# Altium PCB PCB1.pcbdoc
Units mil, origin at the board's own origin, x right, y up, seen from the top; angles counter-clockwise.
Board outline 2481 x 1747.1 mil, 4 copper layers (Top Layer, Inner1, Inner2, Bottom Layer), stack 62.3 mil thick; 64 components, 59 nets, 226 pads, 93 vias.
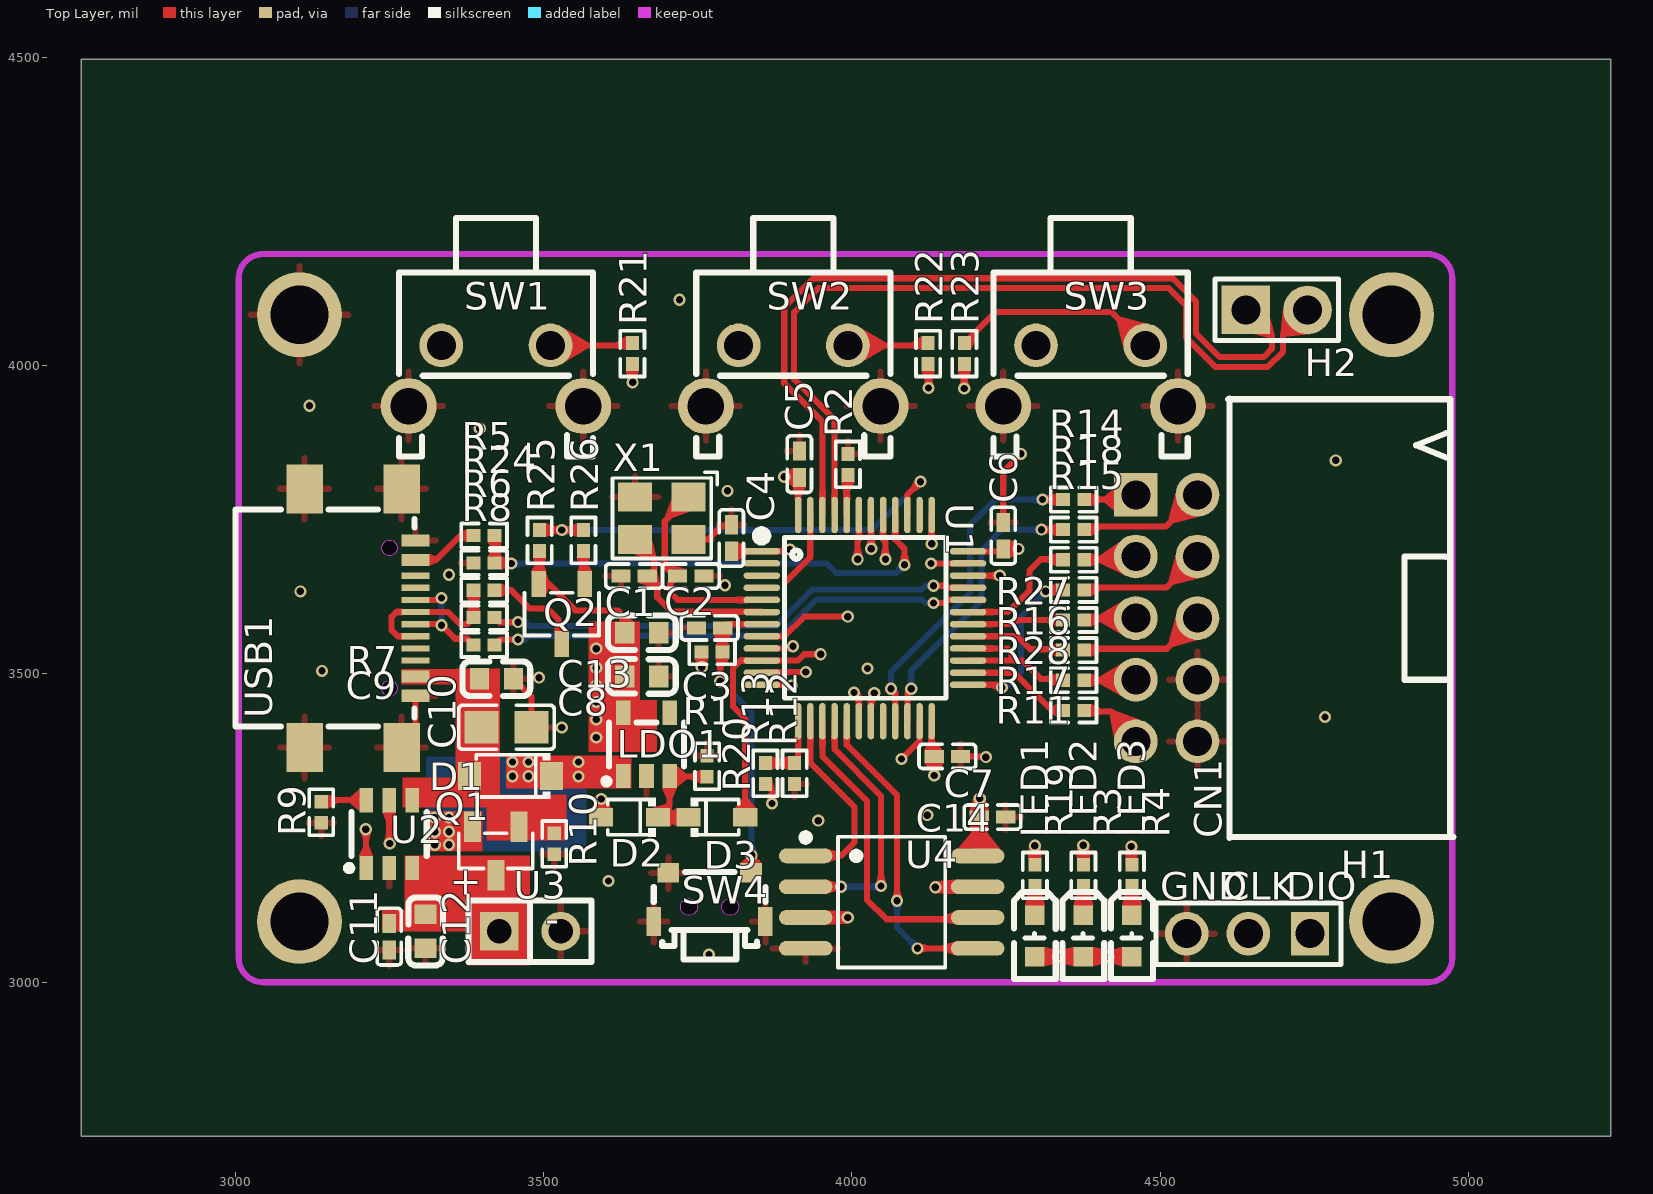
[diagram p0: Top Layer view]
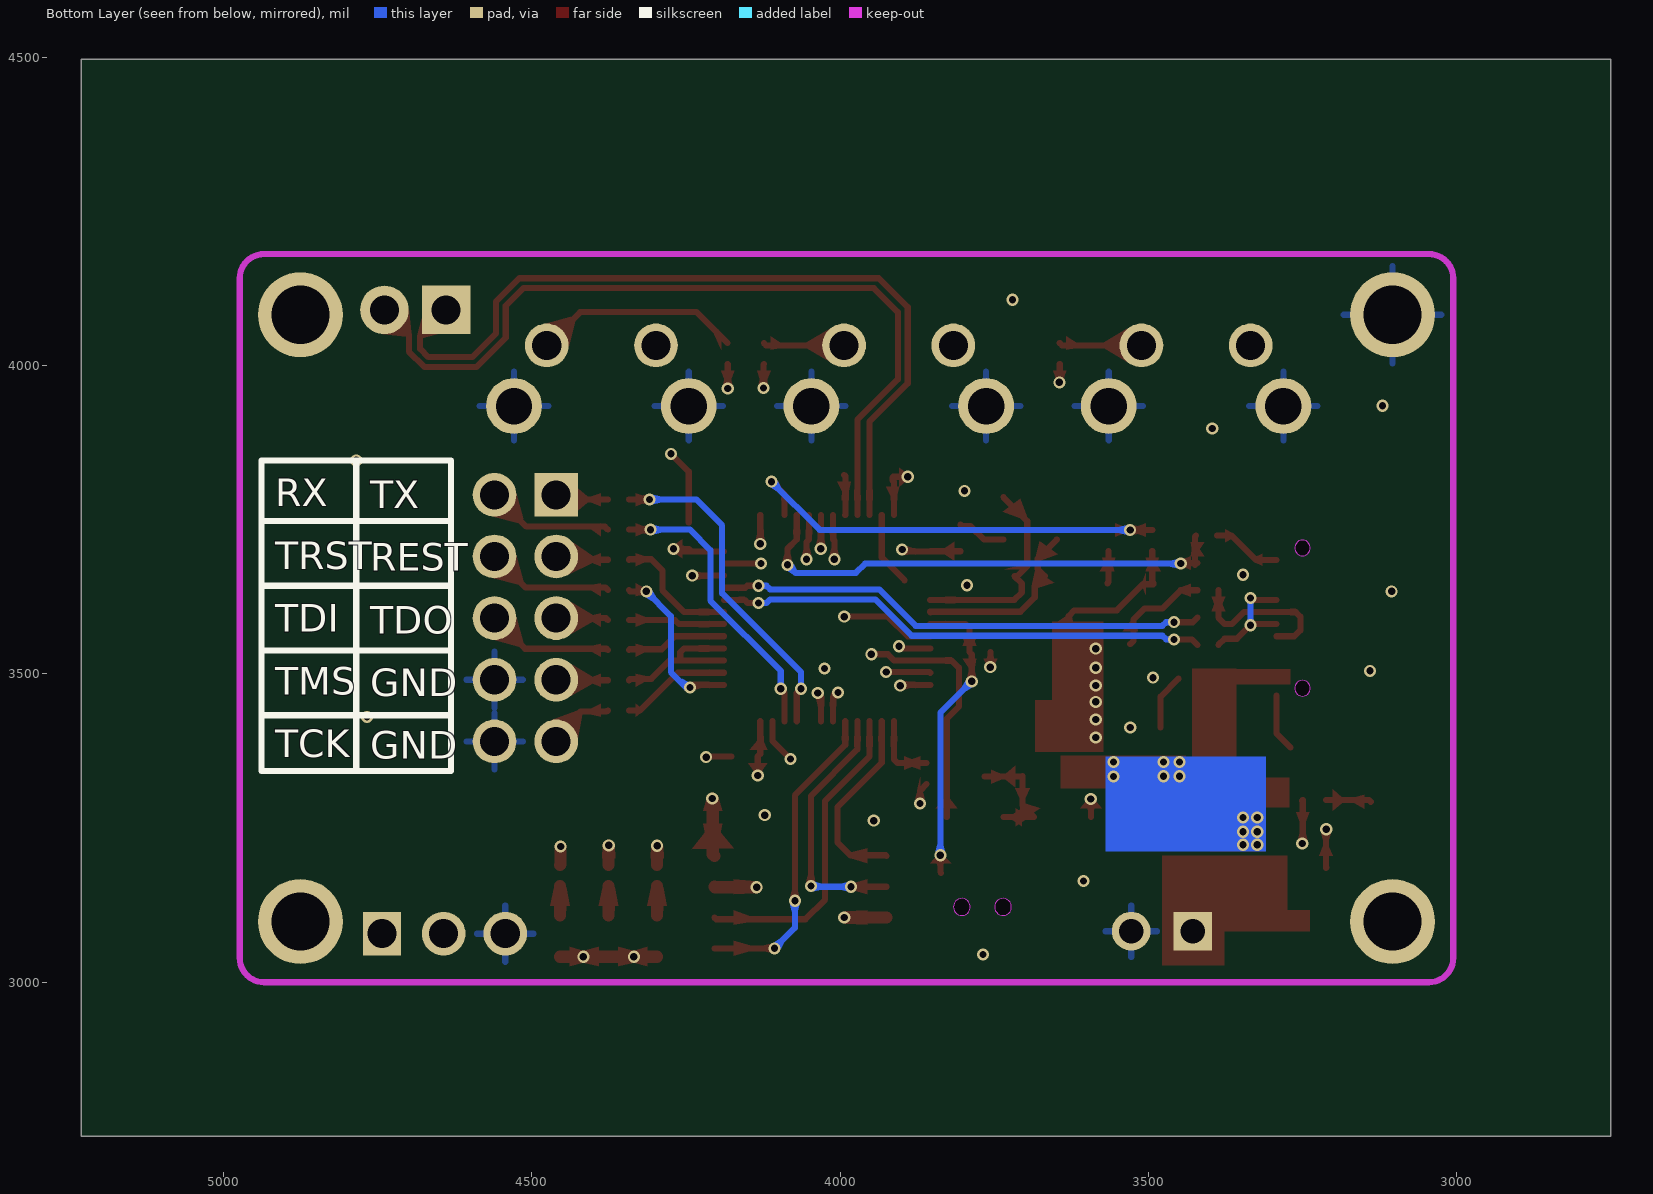
[diagram p1: Bottom Layer view, seen from below]
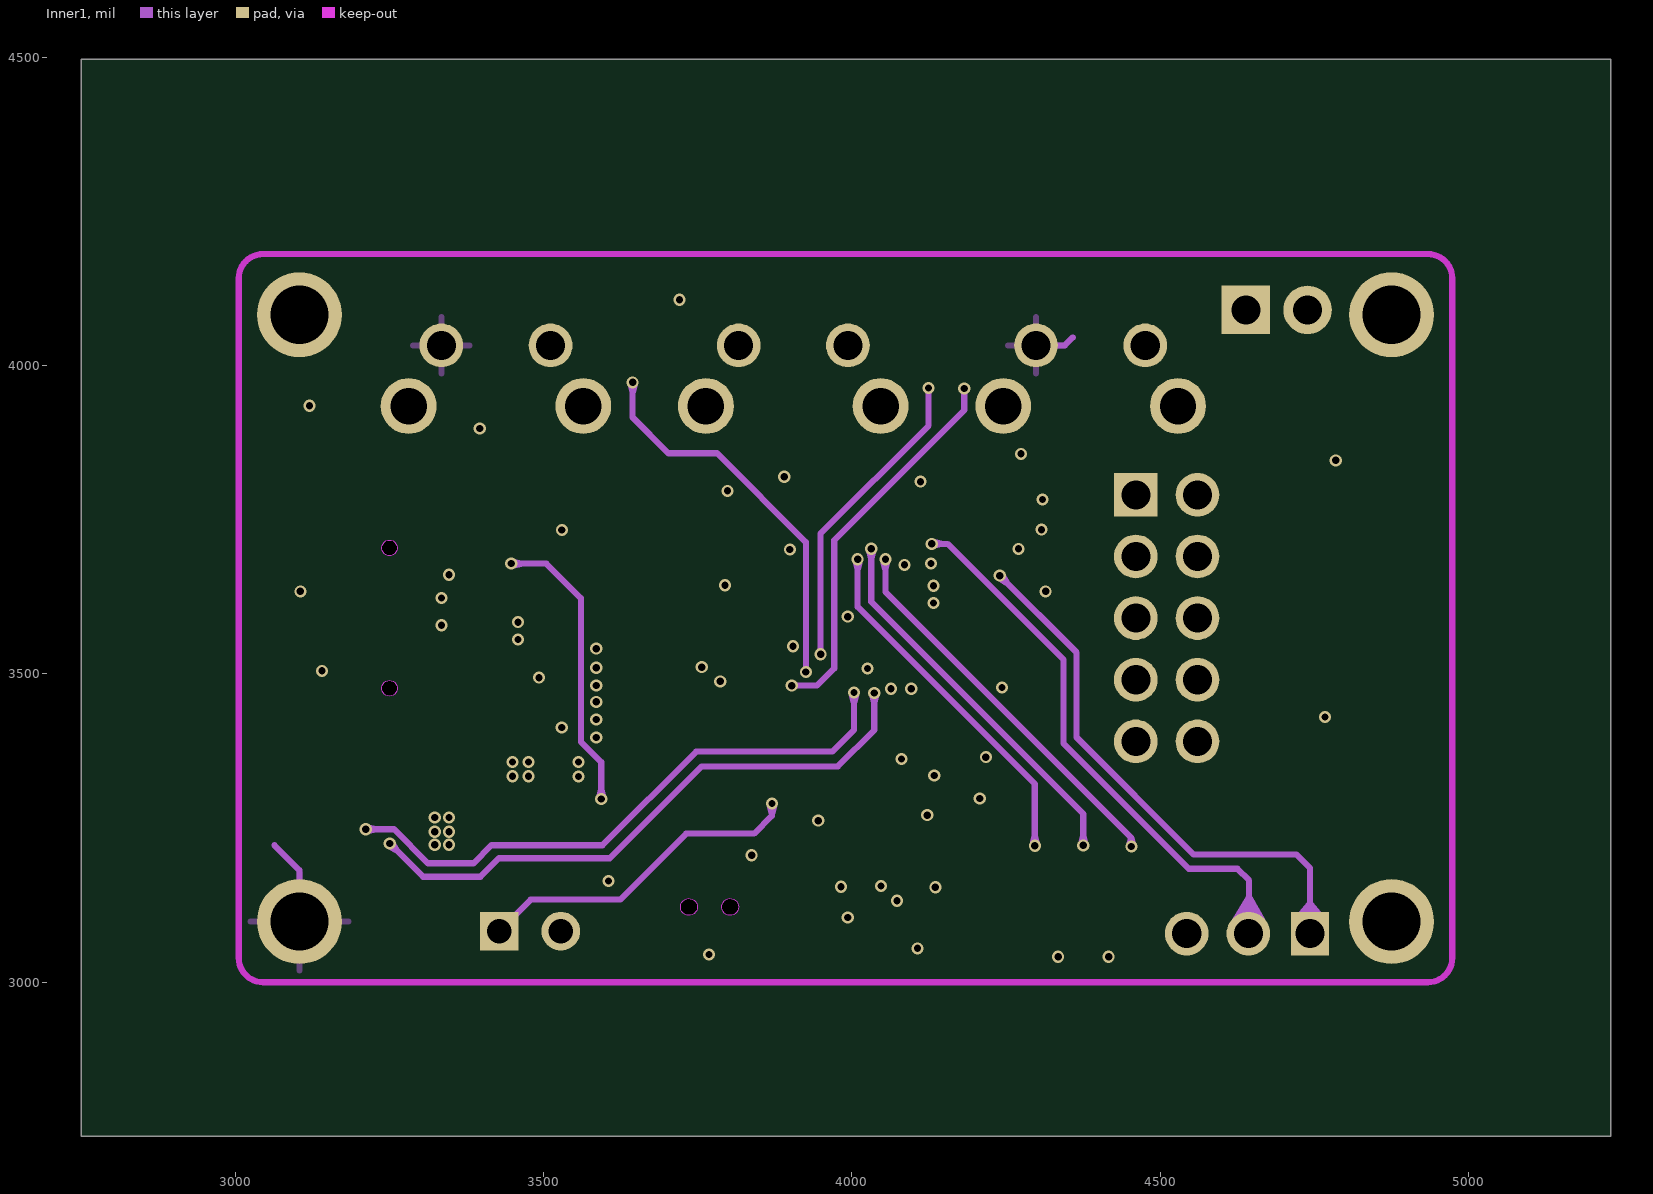
[diagram p2: Inner1]
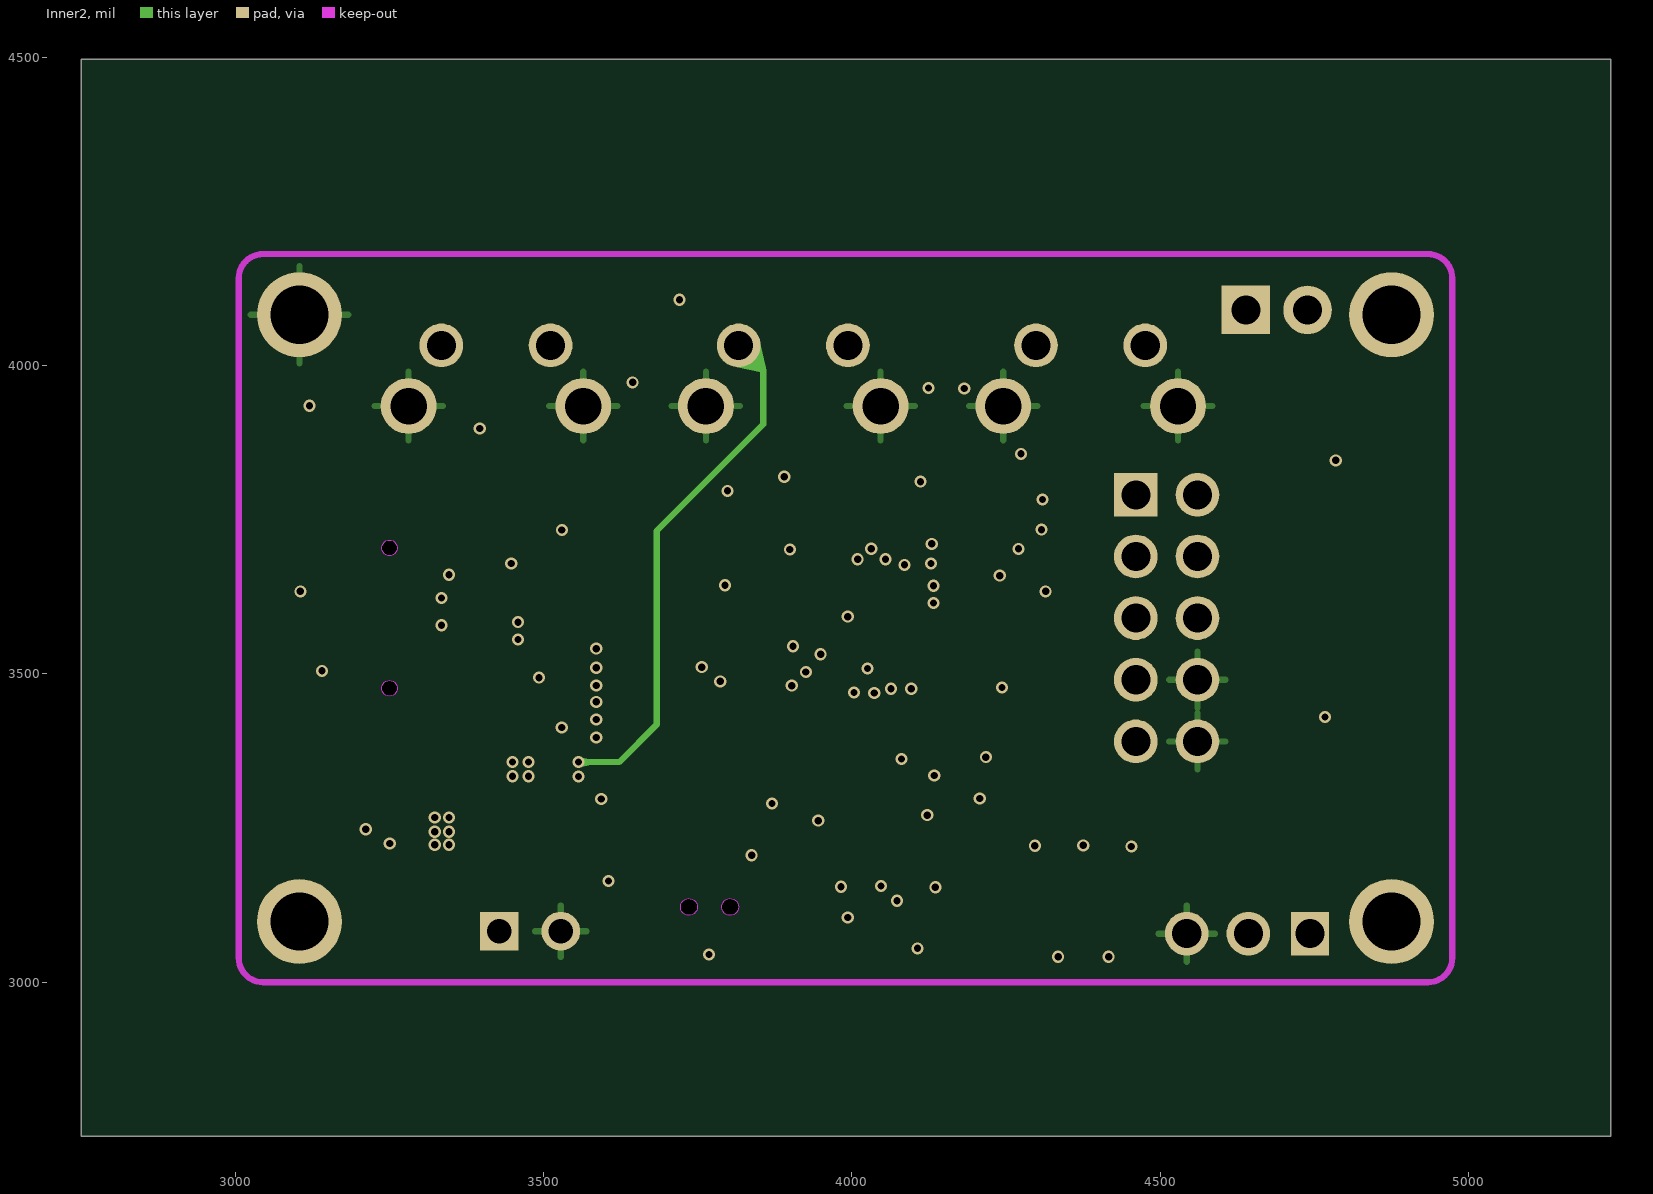
[diagram p3: Inner2]

## Layer stack, top to bottom
Top Solder Mask Layer: solder mask 0.4, Dk 3.3
Top Layer: signal copper 1.4
Dielectric1: surface 18.9, PP, Dk 4.5
Inner1: signal copper 1.4
Dielectric2: surface 18.9, FR4, Dk 4.5
Inner2: signal copper 1.4
Dielectric3: surface 18.9, PP, Dk 4.5
Bottom Layer: signal copper 1.4
Bottom Solder Mask Layer: solder mask 0.4, Dk 3.3

## Board outline
5231,2750 2750,2750 2750,4497.1 5231,4497.1

## Design rules (kind name [scope] priority, off if disabled: settings)
BoardOutlineClearance safeClearance [All] p0: genericclearance=10 ignorepadtopadclearanceinfootprint=FALSE except(0: Arc-SplitContinuation Track-SplitContinuation SMDPad-SplitContinuation THPad-SplitContinuation Via-SplitContinuation Fill-SplitContinuation Poly-SplitContinuation Region-SplitContinuation Text-SplitContinuation)
BoardOutlineClearance Plane_innerPlane [All] p0: genericclearance=10 ignorepadtopadclearanceinfootprint=FALSE except(0: Arc-SplitContinuation Track-SplitContinuation SMDPad-SplitContinuation THPad-SplitContinuation Via-SplitContinuation Fill-SplitContinuation Poly-SplitContinuation Region-SplitContinuation Text-SplitContinuation)
BoardOutlineClearance Copper_copperRegion [All] p0: genericclearance=10 ignorepadtopadclearanceinfootprint=FALSE except(0: Arc-SplitContinuation Track-SplitContinuation SMDPad-SplitContinuation THPad-SplitContinuation Via-SplitContinuation Fill-SplitContinuation Poly-SplitContinuation Region-SplitContinuation Text-SplitContinuation)
BoardOutlineClearance otherClearance [All] p0: genericclearance=10 ignorepadtopadclearanceinfootprint=FALSE except(0: Arc-SplitContinuation Track-SplitContinuation SMDPad-SplitContinuation THPad-SplitContinuation Via-SplitContinuation Fill-SplitContinuation Poly-SplitContinuation Region-SplitContinuation Text-SplitContinuation)
Clearance safeClearance [All] p1: gap=7 ignorepadtopadclearanceinfootprint=FALSE
Clearance Plane_innerPlane [All] p1: gap=7 ignorepadtopadclearanceinfootprint=FALSE
Clearance Copper_copperRegion [All] p1: gap=7 ignorepadtopadclearanceinfootprint=FALSE
Clearance otherClearance [All] p1: gap=7 ignorepadtopadclearanceinfootprint=FALSE
DiffPairsRouting differentialPair [All] p1: maxuncoupledlength=100 minlimit=6 maxlimit=Infinity mostfreqgap=6 toplayer_minwidth=6.4 toplayer_prefwidth=6.4 toplayer_maxwidth=10 bottomlayer_minwidth=6.4 bottomlayer_prefwidth=6.4 bottomlayer_maxwidth=10 midlayer1_minwidth=6.4 midlayer1_prefwidth=6.4 midlayer1_maxwidth=10 midlayer2_minwidth=6.4 midlayer2_prefwidth=6.4 midlayer2_maxwidth=10
PasteMaskExpansion pasteMaskExpansion [All] p1: expansion=0
PlaneConnect innerPlane [All] p1: planeconnectstyle=Relief reliefexpansion=20 reliefentries=4 reliefconductorwidth=10 reliefairgap=10
PolygonConnect copperRegion [All] p1: connectstyle=Relief reliefentries=4 reliefconductorwidth=10 polygonreliefangle="90 Angle" airgapwidth=10
RoutingVias viaSize [All] p1: viastyle="Through Hole" holewidth=11.811 minholewidth=11.811 maxholewidth=236.2204 width=11.811 minwidth=11.811 maxwidth=236.2204
SolderMaskExpansion solderMaskExpansion [IsVia] p1: useseparateexpansions=TRUE expansion=-1000 expansionbottom=-1000
SolderMaskExpansion solderMaskExpansion [All] p2: useseparateexpansions=TRUE expansion=4 expansionbottom=4
Width trackWidth [All] p1: maxlimit=100 minlimit=5 preferedwidth=10

## Components (designator, comment, footprint, x,y, rotation, side; value= is the part's Value field where it differs from the comment)
C1 "" C0402#1 3646.8,3658.8 r180 top
C2 "" C0402#2 3738.9,3658.8 r180 top
C3 "" C0402#1 3769.2,3574.8 r0 top
C4 "" C0402#1 3804.7,3720.5 r270 top
C5 "" C0402#1 3914.9,3840.4 r270 top
C6 "" C0402#2 4245.6,3724.4 r270 top
C7 "" C0402#1 4155.1,3366.1 r180 top
C8 "" C0603#1 3659,3496.1 r180 top
C9 "" C0603#1 3423.6,3492.1 r0 top
C10 "" C0805 3439.7,3413.4 r0 top
C11 "" C0402#3 3249.5,3073.8 r90 top
C12 "" C0603#2 3308.6,3082.7 r90 top
C13 "" C0603#1 3659,3566.9 r180 top
C14 "" C0402#3 4228.1,3267.7 r0 top
CN1 "" IDC-TH_10P-P2.54_Z-231012010106 4510.6,3590.6 r90 top locked
D1 "" SOD-123_L2.8-W1.8-LS3.7-RD 3446.1,3334.6 r180 top
D2 "1N4007WS" SOD-323_L1.8-W1.3-LS2.5-RD#1 3639.3,3267.7 r180 top
D3 "1N4007WS" SOD-323_L1.8-W1.3-LS2.5-RD#2 3781,3267.7 r0 top
H1 "" HDR-TH_3P-P2.54-V-M-1 4643.2,3078.7 r180 top
H2 "PZ254V-11-02P" HDR-TH_2P-P2.54-V-M 4689.3,4090.6 r0 top
LDO1 "" SOT-23-5_L3.0-W1.7-P0.95-LS2.8-BR 3666.9,3385.8 r270 top
LED1 "" LED0603-R-RD 4296.8,3074.8 r270 top
LED2 "" LED0603-R-RD 4375.5,3074.8 r270 top
LED3 "" LED0603-R-RD 4454.3,3074.8 r270 top
Q1 "" SOT-23-3_L2.9-W1.3-P1.90-LS2.4-BR 3422.4,3213 r90 top
Q2 "S8550" SOT-23-3_L2.9-W1.6-P1.90-LS2.8-BR 3529.4,3597 r90 top
R1 "" R0402#1 3773.2,3535.4 r180 top
R2 "" R0402#1 3993.6,3839.9 r270 top
R3 "" R0402#2 4375.5,3173.2 r270 top
R4 "" R0402#2 4454.3,3173.2 r270 top
R5 "" R0402#2 3403.4,3724.4 r180 top
R6 "" R0402#1 3403.4,3635.7 r0 top
R7 "" R0402#1 3403.4,3547 r0 top
R8 "" R0402#2 3403.4,3591.4 r180 top
R9 "" R0402#3 3139.3,3275.6 r90 top
R10 "" R0402#3 3517.3,3224.4 r270 top
R11 "" R0402#1 4359.8,3440.9 r180 top
R12 "" R0402#2 3907,3338.6 r90 top
R13 "" R0402#1 3859.8,3338.6 r270 top
R14 "" R0402#1 4359.8,3782.9 r180 top
R15 "" R0402#1 4359.8,3685.2 r180 top
R16 "" R0402#1 4359.8,3587.5 r180 top
R17 "" R0402#1 4359.8,3489.8 r180 top
R18 "" R0402#2 4359.8,3734.1 r0 top
R19 "" R0402#2 4296.8,3173.2 r270 top
R20 "" R0402#3 3765.3,3350.4 r270 top
R21 "" R0402#2 3643.9,4019.7 r90 top
R22 "" R0402#2 4123.6,4019.7 r90 top
R23 "" R0402#2 4182.6,4019.7 r90 top
R24 "" R0402#1 3403.4,3680.1 r0 top
R25 "" R0402#1 3493.6,3716.5 r90 top
R26 "" R0402#2 3564.5,3716.5 r270 top
R27 "" R0402#2 4359.8,3636.3 r0 top
R28 "" R0402#2 4359.8,3538.6 r0 top
SW1 "" SW-TH_TS-1093C-A6B3-D1 3422.7,3983.8 r180 top locked
SW2 "" SW-TH_TS-1093C-A6B3-D1 3905,3983.8 r180 top locked
SW3 "" SW-TH_TS-1093C-A6B3-D1 4387.3,3983.8 r180 top locked
SW4 "1TS003B-1400-3500A-CT" KEY-SMD_1TS003B 3769.2,3137.8 r0 top locked
U1 "" LQFP-48_L7.0-W7.0-P0.50-LS9.0-BL 4021.2,3590.6 r270 top locked
U2 "" SOT-23-6_L2.9-W1.6-P0.95-LS2.8-BR 3249.5,3240.2 r270 top
U3 "" CONN-TH_T2B-SQ-LF-SN 3477.9,3082.7 r0 top
U4 "" SOP-8_L5.3-W5.2-P1.27-LS7.9-BL 4064.5,3129.9 r270 top locked
USB1 "" USB-C-SMD_TYPE-C-16P-QTGM027 3202.3,3590.6 r270 top locked
X1 "" OSC-SMD_4P-L3.2-W2.5-BL 3691.8,3752.3 r180 top

## Footprints (in the part's own frame and the unit in brackets; to place one, negate y for a bottom-side part, rotate by r counter-clockwise, add the part's x,y. Pads: shape width x height; smd on the part's side, far side on the other; paste and mask are expansions set on the pad)
C0402#1 [mil]
  rect 31.1x21.3 smd paste-3937 mask+2: 1(-21.4,0) 2(21.5,0)
  silkscreen extent -46,-20 46,20
C0402#2 [mil]
  rect 31.1x21.3 smd paste-3937 mask+2: 1(-21.5,0) 2(21.5,0)
  silkscreen extent -46,-20 46,20
C0402#3 [mil]
  rect 31.1x21.3 smd paste-3937 mask+2: 1(-21.5,0) 2(21.4,0)
  silkscreen extent -46,-20 46,20
C0603#1 [mil]
  rect 31.5x35.4 smd paste+0 mask+2: 1(-27.6,0) 2(27.6,0)
  silkscreen extent -55,-28 55,28
C0603#2 [mil]
  rect 31.5x35.4 smd paste+0 mask+2: 1(-27.6,0) 2(27.5,0)
  silkscreen extent -55,-28 55,28
C0805 [mil]
  rect 55.5x53.1 smd paste-3937 mask+2: 1(-40.5,0) 2(40.6,0)
  silkscreen extent -77,-36 77,36
CONN-TH_T2B-SQ-LF-SN [mil]
  rect 63x63 hole 39.4 paste+0 mask+2: 1(-50,0)
  round 63 hole 39.4 paste+0 mask+2: 2(50,0)
  silkscreen extent -100,-50 100,50
HDR-TH_2P-P2.54-V-M [mil]
  rect 78.7x78.7 hole 47.2 paste+0 mask+2: 1(-50,0)
  round 78.7 hole 47.2 paste+0 mask+2: 2(50,0)
  silkscreen extent -100,-50 100,50
HDR-TH_3P-P2.54-V-M-1 [mil]
  rect 62x70.9 hole 47.2 paste+0 mask+2: 1(-100,0)
  round 70.9 hole 47.2 paste+0 mask+2: 2(0,0) 3(100,0)
  silkscreen extent -150,-50 150,50
IDC-TH_10P-P2.54_Z-231012010106 [mil]
  rect 70.9x70.9 hole 47.2 paste+0 mask+2: 1(200,50)
  round 70.9 hole 47.2 paste+0 mask+2: 2(200,-50) 3(100,50) 4(100,-50) 5(0,50) 6(0,-50) 7(-100,50) 8(-100,-50) 9(-200,50) 10(-200,-50)
  silkscreen extent -356,-465 356,-100
KEY-SMD_1TS003B [mil]
  rect 35.4x31.5 smd paste+0 mask+2: 1(67,39.4) 2(-66.9,39.4)
  rect 23.6x47.2 smd paste+0 mask+2: 3(-90.5,-39.4) 4(90.6,-39.4)
  Board Outline Layer lines w0.1: -47.1,-17.4 -46.4,-20.5 -44.9,-23.3 -42.9,-25.8 -40.3,-27.7 -37.4,-29 -34.2,-29.5 -31,-29.3 -28,-28.4 -25.2,-26.8 -22.9,-24.6 -21.1,-21.9 -20,-18.9 -19.7,-15.8 -20,-12.6 -21.1,-9.6 -22.9,-6.9 -25.2,-4.7 -28,-3.1 -31,-2.2 -34.2,-2 -37.4,-2.6 -40.3,-3.8 -42.9,-5.7 -44.9,-8.2 -46.4,-11.1 -47.1,-14.2 -47.1,-17.4 ; 19.8,-17.4 20.5,-20.5 22,-23.3 24,-25.8 26.6,-27.7 29.5,-29 32.7,-29.5 35.9,-29.3 39,-28.4 41.7,-26.8 44.1,-24.6 45.8,-21.9 46.9,-18.9 47.3,-15.8 46.9,-12.6 45.8,-9.6 44.1,-6.9 41.7,-4.7 39,-3.1 35.9,-2.2 32.7,-2 29.5,-2.6 26.6,-3.8 24,-5.7 22,-8.2 20.5,-11 19.8,-14.2 19.8,-17.4
  Board Outline Layer region: -19.7,-15.8 -20,-18.9 -21.1,-21.9 -22.9,-24.6 -25.2,-26.8 -28,-28.4 -31,-29.3 -34.2,-29.5 -37.4,-29 -40.3,-27.7 -42.9,-25.8 -44.9,-23.3 -46.4,-20.5 -47.1,-17.4 -47.1,-14.2 -46.4,-11.1 -44.9,-8.2 -42.9,-5.7 -40.3,-3.8 -37.4,-2.6 -34.2,-2 -31,-2.2 -28,-3.1 -25.2,-4.7 -22.9,-6.9 -21.1,-9.6 -20,-12.6
  Board Outline Layer region: -19.7,-15.8 -20,-18.9 -21.1,-21.9 -22.9,-24.6 -25.2,-26.8 -28,-28.4 -31,-29.3 -34.2,-29.5 -37.4,-29 -40.3,-27.7 -42.9,-25.8 -44.9,-23.3 -46.4,-20.5 -47.1,-17.4 -47.1,-14.2 -46.4,-11.1 -44.9,-8.2 -42.9,-5.7 -40.3,-3.8 -37.4,-2.6 -34.2,-2 -31,-2.2 -28,-3.1 -25.2,-4.7 -22.9,-6.9 -21.1,-9.6 -20,-12.6
  Board Outline Layer region: 47.3,-15.8 46.9,-18.9 45.8,-21.9 44.1,-24.6 41.7,-26.8 39,-28.4 35.9,-29.3 32.7,-29.5 29.5,-29 26.6,-27.7 24,-25.8 22,-23.3 20.5,-20.5 19.8,-17.4 19.8,-14.2 20.5,-11 22,-8.2 24,-5.7 26.6,-3.8 29.5,-2.6 32.7,-2 35.9,-2.2 39,-3.1 41.7,-4.7 44.1,-6.9 45.8,-9.6 46.9,-12.6
  Board Outline Layer region: 47.3,-15.8 46.9,-18.9 45.8,-21.9 44.1,-24.6 41.7,-26.8 39,-28.4 35.9,-29.3 32.7,-29.5 29.5,-29 26.6,-27.7 24,-25.8 22,-23.3 20.5,-20.5 19.8,-17.4 19.8,-14.2 20.5,-11 22,-8.2 24,-5.7 26.6,-3.8 29.5,-2.6 32.7,-2 35.9,-2.2 39,-3.1 41.7,-4.7 44.1,-6.9 45.8,-9.6 46.9,-12.6
  Multi-Layer board cut-out: -19.7,-15.8 -20,-18.9 -21.1,-21.9 -22.9,-24.6 -25.2,-26.8 -28,-28.4 -31,-29.3 -34.2,-29.5 -37.4,-29 -40.3,-27.7 -42.9,-25.8 -44.9,-23.3 -46.4,-20.5 -47.1,-17.4 -47.1,-14.2 -46.4,-11.1 -44.9,-8.2 -42.9,-5.7 -40.3,-3.8 -37.4,-2.6 -34.2,-2 -31,-2.2 -28,-3.1 -25.2,-4.7 -22.9,-6.9 -21.1,-9.6 -20,-12.6
  Multi-Layer board cut-out: 47.3,-15.8 46.9,-18.9 45.8,-21.9 44.1,-24.6 41.7,-26.8 39,-28.4 35.9,-29.3 32.7,-29.5 29.5,-29 26.6,-27.7 24,-25.8 22,-23.3 20.5,-20.5 19.8,-17.4 19.8,-14.2 20.5,-11 22,-8.2 24,-5.7 26.6,-3.8 29.5,-2.6 32.7,-2 35.9,-2.2 39,-3.1 41.7,-4.7 44.1,-6.9 45.8,-9.6 46.9,-12.6
  silkscreen extent -91,-101 91,41
LED0603-R-RD [mil]
  rect 31.5x31.5 smd paste+0 mask+2: 1(33.5,0) 2(-33.5,0)
  silkscreen extent -72,-34 70,34
LQFP-48_L7.0-W7.0-P0.50-LS9.0-BL [mil]
  oval 10.6x59.1 smd paste+0 mask+2: 1(-108.3,-167.3) 2(-88.6,-167.3) 3(-68.9,-167.3) 4(-49.2,-167.3) 5(-29.5,-167.3) 6(-9.8,-167.3) 7(9.8,-167.3) 8(29.5,-167.3) 9(49.2,-167.3) 10(68.9,-167.3) 11(88.6,-167.3) 12(108.3,-167.3) 25(108.3,167.3) 26(88.6,167.3) 27(68.9,167.3) 28(49.2,167.3) 29(29.5,167.3) 30(9.8,167.3) 31(-9.8,167.3) 32(-29.5,167.3) 33(-49.2,167.3) 34(-68.9,167.3) 35(-88.6,167.3) 36(-108.3,167.3)
  oval 59.1x10.6 smd paste+0 mask+2: 13(167.3,-108.3) 14(167.3,-88.6) 15(167.3,-68.9) 16(167.3,-49.2) 17(167.3,-29.5) 18(167.3,-9.8) 19(167.3,9.8) 20(167.3,29.5) 21(167.3,49.2) 22(167.3,68.9) 23(167.3,88.6) 24(167.3,108.3) 37(-167.3,108.3) 38(-167.3,88.6) 39(-167.3,68.9) 40(-167.3,49.2) 41(-167.3,29.5) 42(-167.3,9.8) 43(-167.3,-9.8) 44(-167.3,-29.5) 45(-167.3,-49.2) 46(-167.3,-68.9) 47(-167.3,-88.6) 48(-167.3,-108.3)
  silkscreen extent -141,-176 130,132
OSC-SMD_4P-L3.2-W2.5-BL [mil]
  rect 55.1x47.2 smd paste+0 mask+2: 1(-43.4,-34.5) 2(43.3,-34.5) 3(43.3,34.4) 4(-43.4,34.4)
  silkscreen extent -90,-75 80,65
R0402#1 [mil]
  rect 22.3x21.3 smd paste-3937 mask+2: 1(-17,0) 2(17.1,0)
  silkscreen extent -37,-20 37,20
R0402#2 [mil]
  rect 22.3x21.3 smd paste-3937 mask+2: 1(-17.1,0) 2(17,0)
  silkscreen extent -37,-20 37,20
R0402#3 [mil]
  rect 22.3x21.3 smd paste-3937 mask+2: 1(-17,0) 2(17,0)
  silkscreen extent -37,-20 37,20
SOD-123_L2.8-W1.8-LS3.7-RD [mil]
  rect 37.4x45.3 smd paste+0 mask+2: 1(-66.6,0) 2(66.6,0)
  silkscreen extent -64,-37 55,37
SOD-323_L1.8-W1.3-LS2.5-RD#1 [mil]
  rect 39.4x29.5 smd paste+0 mask+2: 1(-46.2,0) 2(46.2,0)
  silkscreen extent -43,-32 36,32
SOD-323_L1.8-W1.3-LS2.5-RD#2 [mil]
  rect 39.4x29.5 smd paste+0 mask+2: 1(-46.1,0) 2(46.2,0)
  silkscreen extent -42,-32 36,32
SOP-8_L5.3-W5.2-P1.27-LS7.9-BL [mil]
  oval 24x86.8 smd paste+0 mask+2: 1(-75,-139.5) 2(-25,-139.5) 3(25,-139.5) 4(75,-139.5) 5(75,139.5) 6(25,139.5) 7(-25,139.5) 8(-75,139.5)
  silkscreen extent -111,-145 106,87
SOT-23-3_L2.9-W1.3-P1.90-LS2.4-BR [mil]
  rect 49.2x27.6 smd paste+0 mask+2: 1(39.4,-37.4) 2(39.4,37.4) 3(-39.4,0)
  silkscreen extent -29,-60 29,60
SOT-23-3_L2.9-W1.6-P1.90-LS2.8-BR [mil]
  rect 42.1x23.6 smd paste+0 mask+2: 1(48.6,-37.4) 2(48.6,37.4) 3(-48.6,0)
  silkscreen extent -35,-60 35,60
SOT-23-5_L3.0-W1.7-P0.95-LS2.8-BR [mil]
  rect 39.4x23.6 smd paste+0 mask+2: 1(51.2,-37.4) 2(51.2,0) 3(51.2,37.4) 4(-51.2,37.4) 5(-51.2,-37.4)
  silkscreen extent -35,-70 65,61
SOT-23-6_L2.9-W1.6-P0.95-LS2.8-BR [mil]
  rect 39.4x21.7 smd paste+0 mask+2: 1(55.1,-37.4) 2(55.1,0) 3(55.1,37.4) 4(-55.1,37.4) 5(-55.1,0) 6(-55.1,-37.4)
  silkscreen extent -35,-70 60,61
SW-TH_TS-1093C-A6B3-D1 [mil]
  round 70.9 hole 47.2 paste+0 mask+2: 1(-88.6,-49.2) 2(88.6,-49.2)
  round 90.6 hole 59.1 paste+0 mask+2: 3(-141.7,49.2) 4(141.7,49.2)
  silkscreen extent -158,-256 158,131
USB-C-SMD_TYPE-C-16P-QTGM027 [mil]
  rect 79.5x59.1 smd paste+0 mask+2: 17(209.8,67.4) 18(209.8,-90) 19(-209.8,-90) 20(-209.8,67.4)
  rect 19.7x45.3 smd paste+0 mask+2: A1(-126,90.1) A4(-94.5,90.1) A9(94.5,90.1) A12(126,90.1)
  rect 10.2x45.3 smd paste+0 mask+2: A5(-49.2,90.1) A6(-9.8,90.1) A7(9.8,90.1) A8(49.2,90.1) B5(68.9,90.1) B6(29.5,90.1) B7(-29.5,90.1) B8(-68.9,90.1)
  Board Outline Layer lines w0.1: 115.4,35 118.4,35.7 121.1,37.2 123.4,39.2 125.2,41.8 126.3,44.6 126.6,47.7 126.3,50.8 125.2,53.6 123.4,56.2 121.1,58.2 118.4,59.7 115.4,60.4 112.3,60.4 109.3,59.7 106.6,58.2 104.3,56.2 102.5,53.6 101.4,50.8 101,47.7 101.4,44.6 102.5,41.8 104.3,39.2 106.6,37.2 109.3,35.7 112.3,35 115.4,35 ; -112.2,35 -109.2,35.7 -106.5,37.2 -104.2,39.2 -102.4,41.8 -101.3,44.6 -101,47.7 -101.3,50.8 -102.4,53.6 -104.2,56.2 -106.5,58.2 -109.2,59.7 -112.2,60.4 -115.3,60.4 -118.3,59.7 -121,58.2 -123.3,56.2 -125.1,53.6 -126.2,50.8 -126.6,47.7 -126.2,44.6 -125.1,41.8 -123.3,39.2 -121,37.2 -118.3,35.7 -115.3,35 -112.2,35
  Board Outline Layer region: -101,47.7 -101.3,44.6 -102.4,41.8 -104.2,39.2 -106.5,37.2 -109.2,35.7 -112.2,35 -115.3,35 -118.3,35.7 -121,37.2 -123.3,39.2 -125.1,41.8 -126.2,44.6 -126.6,47.7 -126.2,50.8 -125.1,53.6 -123.3,56.2 -121,58.2 -118.3,59.7 -115.3,60.4 -112.2,60.4 -109.2,59.7 -106.5,58.2 -104.2,56.2 -102.4,53.6 -101.3,50.8
  Board Outline Layer region: -101,47.7 -101.3,44.6 -102.4,41.8 -104.2,39.2 -106.5,37.2 -109.2,35.7 -112.2,35 -115.3,35 -118.3,35.7 -121,37.2 -123.3,39.2 -125.1,41.8 -126.2,44.6 -126.6,47.7 -126.2,50.8 -125.1,53.6 -123.3,56.2 -121,58.2 -118.3,59.7 -115.3,60.4 -112.2,60.4 -109.2,59.7 -106.5,58.2 -104.2,56.2 -102.4,53.6 -101.3,50.8
  Board Outline Layer region: 126.6,47.7 126.3,44.6 125.2,41.8 123.4,39.2 121.1,37.2 118.4,35.7 115.4,35 112.3,35 109.3,35.7 106.6,37.2 104.3,39.2 102.5,41.8 101.4,44.6 101,47.7 101.4,50.8 102.5,53.6 104.3,56.2 106.6,58.2 109.3,59.7 112.3,60.4 115.4,60.4 118.4,59.7 121.1,58.2 123.4,56.2 125.2,53.6 126.3,50.8
  Board Outline Layer region: 126.6,47.7 126.3,44.6 125.2,41.8 123.4,39.2 121.1,37.2 118.4,35.7 115.4,35 112.3,35 109.3,35.7 106.6,37.2 104.3,39.2 102.5,41.8 101.4,44.6 101,47.7 101.4,50.8 102.5,53.6 104.3,56.2 106.6,58.2 109.3,59.7 112.3,60.4 115.4,60.4 118.4,59.7 121.1,58.2 123.4,56.2 125.2,53.6 126.3,50.8
  Multi-Layer board cut-out: -101,47.7 -101.3,44.6 -102.4,41.8 -104.2,39.2 -106.5,37.2 -109.2,35.7 -112.2,35 -115.3,35 -118.3,35.7 -121,37.2 -123.3,39.2 -125.1,41.8 -126.2,44.6 -126.6,47.7 -126.2,50.8 -125.1,53.6 -123.3,56.2 -121,58.2 -118.3,59.7 -115.3,60.4 -112.2,60.4 -109.2,59.7 -106.5,58.2 -104.2,56.2 -102.4,53.6 -101.3,50.8
  Multi-Layer board cut-out: 126.6,47.7 126.3,44.6 125.2,41.8 123.4,39.2 121.1,37.2 118.4,35.7 115.4,35 112.3,35 109.3,35.7 106.6,37.2 104.3,39.2 102.5,41.8 101.4,44.6 101,47.7 101.4,50.8 102.5,53.6 104.3,56.2 106.6,58.2 109.3,59.7 112.3,60.4 115.4,60.4 118.4,59.7 121.1,58.2 123.4,56.2 125.2,53.6 126.3,50.8
  silkscreen extent -176,-202 176,88

## Free pads (board coordinates)
  round 137.8 hole 94.5: 0(3103.9,3098.4) 0(3103.9,4082.7) 0(4875.5,3098.4) 0(4875.5,4082.7)

## Via types
v1: diameter 19.7, hole 11.8, Top Layer to Bottom Layer, 93 vias

## Nets (pads, with @x,y where several pads share a name; then routed paths per layer and width w, separated by ;. In a path a pad name is that pad's centre, name@x,y a point inside that pad or via, vN(x,y) a via of type N, cw(c..) or ccw(c..) an arc to the next point about the centre after c; other vN are vias at no path point)
3.3V: C4.2 C5.2 C6.2 C7.2 C8.2 C13.2 C14.1 LDO1.5 LED1.1 LED2.1 LED3.1 pad.0@3103.9,3098.4 Q2.2 R1.2 R25.1 SW1.2 SW3.2 U1.1 U1.9 U1.24 U1.36 U1.48 U4.3 U4.7 U4.8 | length 1430.4
  Top Layer w10: Q2.2@3491.7,3647.1 3493.6,3649 R25.1 ; Q2.2 3508.8,3645.6 3551.4,3603 3620.4,3603 3629.4,3594 3629.4,3498 C8.2 3631.4,3439 LDO1.5 ; R1.2 3756.1,3511.3 v1(3756.4,3511) ; C4.2 3853.7,3699 U1.1 3896.3,3698.9 v1(3899.4,3702) ; U1.9 3900.8,3541.4 v1(3904.4,3545) ; v1(3890.4,3820) 3913.8,3820 C5.2 3914.9,3813.9 3912.9,3811.9 U1.48 ; U1.24 4129.5,3370.2 C7.2 v1(4133.6,3335.1) v1@4132.4,3334 ; U1.36 C6.2@4241.5,3698.9 ; C6.2@4241.5,3698.9 C6.2 v1(4270.4,3702.9) 4266.3,3698.9 C6.2@4241.5,3698.9
  Top Layer w19.7: U4.3 3993.4,3104.9 v1(3993.4,3105) ; v1(4135.4,3154) 4203.1,3154 U4.7 ; U4.8 4206.6,3207.5 C14.1 4206.6,3297.2 v1(4207.4,3298) ; LED1.1 v1(4334.6,3041.3) LED2.1 v1(4416.5,3041.3) LED3.1
  Inner1 w10: 3063.4,3222 3103.9,3181.6 pad.0@3103.9,3098.4 ; SW3.2 4345.4,4033 4358.4,4046
  other v1: 3585.4,3396.9 3585.4,3426 3585.4,3454.7 3585.4,3481.4 3585.4,3510.1 3585.4,3541
5V: C9.1 C10.1 D1.2 Q1.1 R10.1 U2.4 USB1.A9
5V_S: R5.2 USB1.A4 | length 112.5
  Top Layer w10: USB1.A4 3325.5,3685.1 3364.9,3724.4 R5.2@3388.7,3724.4
$1N1115: C1.1 U1.6 X1.3 | length 298.9
  Top Layer w10: X1.3 3679.4,3687 3679.4,3670.1 C1.1 3684.4,3642.6 3684.4,3624.2 3707.6,3601 3854.5,3601 U1.6@3853.5,3600
$1N1116: C2.2 U1.5 X1.1 | length 340.8
  Top Layer w10: X1.1 3696.4,3748.1 3696.4,3675 3712.6,3658.8 C2.2 3705.4,3646.9 3705.4,3632 3717.4,3620 U1.5@3853.8,3620
$1N8401: R9.2 U2.6 | length 73.9
  Top Layer w10: R9.2 3141.9,3295.3 U2.6
$1N11995: D2.1 D3.1 LDO1.3 R20.2 | length 185.6
  Top Layer w10: D3.1 D2.1 3704.3,3286.5 LDO1.3 3705.5,3333.4 R20.2
$1N16874: CN1.1 R14.1 | length 87
  Top Layer w10: R14.1 4452.9,3782.9 CN1.1
$1N18455: CN1.3 R15.1 | length 86
  Top Layer w10: R15.1 4455.2,3685.2 CN1.3
$1N18483: CN1.5 R16.1 | length 85.1
  Top Layer w10: R16.1 4379.9,3590.6 CN1.5
$1N18511: CN1.7 R17.1 | length 84.1
  Top Layer w10: R17.1 4459.8,3489.8 CN1.7
$1N24488: LED1.2 R19.2 | length 47.9
  Top Layer w19.7: LED1.2 R19.2
$1N24516: LED2.2 R3.2 | length 47.9
  Top Layer w19.7: LED2.2 R3.2
$1N24544: LED3.2 R4.2 | length 47.9
  Top Layer w19.7: LED3.2 R4.2
$1N37909: R21.2 SW1.1 | length 134.1
  Top Layer w10: SW1.1 3640.1,4033 R21.2
$1N37992: R22.2 SW2.1 | length 131.5
  Top Layer w10: SW2.1 4119.8,4033 R22.2
$1N38075: R23.2 SW3.1 | length 336.5
  Top Layer w10: R23.2 4232.9,4087 4421.9,4087 SW3.1
$1N39164: Q2.3 R6.2 | length 165.3
  Top Layer w10: R6.2 3447.7,3635.7 3477.4,3606 3506.4,3606 3524.4,3588 3524.4,3553.4 Q2.3
$1N39413: Q2.1 R26.2 | length 53.3
  Top Layer w10: R26.2 3564.5,3649 Q2.1@3566.5,3647.1
$1N40670: CN1.9 R11.1 | length 110
  Top Layer w10: R11.1 4378.8,3439 4421.4,3439 4460.6,3399.9 CN1.9
$1N41019: CN1.2 R18.2 | length 207.2
  Top Layer w10: R18.2 4381.8,3739 4509,3739 CN1.2
$1N41105: CN1.4 R27.2 | length 206.3
  Top Layer w10: R27.2 4380.5,3640 4510,3640 CN1.4
$1N41192: CN1.6 R28.2 | length 205.3
  Top Layer w10: R28.2 4379.2,3541 4511,3541 CN1.6
BAT: C11.2 C12.2 Q1.3 R13.2 U2.3 U3.1 | length 576
  Top Layer w10: R13.2 3870.4,3310.9 v1(3870.4,3290)
  Inner1 w10: U3.1 3479.2,3134 3624.4,3134 3731.4,3241 3841.4,3241 3870.4,3270 v1(3870.4,3290)
BAT_ADC: R12.2 R13.1 U1.13 | length 117.3
  Top Layer w10: R13.1 R12.2 3912.9,3361.5 U1.13
BOOT: R2.2 U1.44 | length 66
  Top Layer w10: U1.44 3991.4,3758.1 3991.4,3820.6 R2.2
CHRG: U1.18 U2.1 | length 1079.5
  Top Layer w10: U2.1@3211.4,3185.8 U2.1 3212.1,3247.3 v1(3211.4,3248) ; v1(4003.4,3470) 4011.4,3462.1 U1.18
  Inner1 w10: v1(3211.4,3248) 3257.4,3248 3312.4,3193 3386.4,3193 3415.4,3222 3595.4,3222 3747.4,3374 3968.4,3374 4003.4,3409 v1(4003.4,3470)
D+: R6.1 R8.2 USB1.A6 USB1.B6 | length 257.8
  Top Layer w10: USB1.B6 3263.4,3561.1 3253.4,3571 3253.4,3593 3260.8,3600.4 USB1.A6 3345.1,3600.4 3364.4,3581 3376,3581 R8.2 R6.1
D-: R7.1 USB1.A7 USB1.B7 | length 195.4
  Top Layer w10: USB1.A7 3292.6,3581 3332.4,3581 v1(3334.4,3579) 3356.4,3557 3376.4,3557 R7.1 ; USB1.B7@3292.5,3620 3331.3,3620 v1(3334.4,3623.1)
  Bottom Layer w10: v1(3334.4,3579) v1@3334.4,3623
GND: C1.2 C2.1 C3.1 C4.1 C5.1 C6.1 C7.1 C8.1 C9.2 C10.2 C11.1 C12.1 C13.1 C14.2 CN1.8 CN1.10 H1.3 LDO1.2 pad.0@3103.9,4082.7 R2.1 R9.1 R10.2 R12.1 R20.1 R24.1 SW1.3 SW1.4 SW2.3 SW2.4 SW3.3 SW3.4 SW4.2 SW4.3 SW4.4 U1.8 U1.23 U1.35 U1.47 U2.2 U3.2 U4.4 USB1.17 USB1.18 USB1.19 USB1.20 USB1.A1 USB1.A12 X1.2 X1.4 | length 835.5
  Top Layer w10: USB1.17 3292.4,3403.5 USB1.A12 ; C9.2 3480.3,3463 C10.2 ; X1.4 3766.5,3717.9 3788.6,3740 3802.7,3740 C4.1 ; U1.8 3890.4,3561.1 3922.4,3593 v1(3993.4,3593) ; 3895.4,3652 3932.6,3689.1 U1.47 ; v1(4080.4,3362) 4109.8,3391.3 U1.23 ; v1(4128.4,3679) 4188.3,3679 U1.35 ; C7.1 4216.3,3366.1 v1(4217.4,3365) ; C6.1 4245.6,3828.2 v1(4274.4,3857)
  other v1: 3768.3,3044.8 3605.4,3164 3945.4,3262 4122.4,3271 3529.4,3413 4767.4,3430 3492.4,3494 3140.4,3505 4025.4,3509 3105.4,3634 3794.4,3644 3346.4,3661 3798.4,3797 4785,3846.5 3396.4,3898 3120.4,3935 3720.4,4107
IIC_SCL: H2.2 U1.45 | length 1343.4
  Top Layer w10: U1.45 3972,3912.4 3906.4,3978 3906.4,4087 3945.4,4126 4513.8,4126 4542.4,4097.4 4542.4,4045.4 4589.8,3998 4674.4,3998 4699.4,4023 4699.4,4050.7 H2.2
IIC_SDA: H2.1 U1.46 | length 1342.8
  Top Layer w10: U1.46 3952.4,3758 3952.4,3909.4 3890.4,3971.4 3890.4,4095 3937.4,4142 4520.4,4142 4558.4,4104 4558.4,4052 4596.4,4014 4667.8,4014 4681.4,4027.6 4681.4,4048.4 H2.1
KEY_L: R21.1 U1.11 | length 734.5
  Top Layer w10: R21.1 3643.9,3973.6 v1(3644.4,3973) ; U1.11 3854.9,3503 v1(3925.4,3503)
  Inner1 w10: v1(3644.4,3973) 3644.4,3916 3702.4,3858 3781.4,3858 3925.6,3713.8 3925.6,3503.2 v1(3925.4,3503)
KEY_M: D3.2 R22.1 U1.10 | length 945
  Top Layer w10: D3.2 3827.2,3427.2 3807.4,3447 3807.4,3510 3819.1,3521.7 U1.10 3912.1,3521.7 3922.4,3532 v1(3949.4,3532) ; R22.1 4124.4,4001.8 v1(4124.4,3964)
  Inner1 w10: v1(3949.4,3532) 3949.4,3728 4124.4,3903 v1(4124.4,3964)
KEY_R: R23.1 U1.12 | length 710.8
  Top Layer w10: U1.12 3901.2,3482.3 v1(3902.4,3481) ; v1(4182.4,3963) 4182.4,4002.5 R23.1
  Inner1 w10: v1(3902.4,3481) 3943.4,3481 3971.4,3509 3971.4,3717 4182.4,3928 v1(4182.4,3963)
LED1: R19.1 U1.43 | length 687.5
  Top Layer w10: v1(4009.4,3686) 4009.4,3716.2 4011.4,3718.1 U1.43
  Top Layer w19.7: R19.1 v1(4296.8,3221.4)
  Inner1 w10: v1(4009.4,3686) 4009.4,3609 4296.8,3321.7 v1(4296.8,3221.4)
LED2: R3.1 U1.42 | length 710.3
  Top Layer w10: U1.42 4031,3703.5 v1(4031.4,3703)
  Top Layer w19.7: v1(4375.4,3222) 4375.5,3221.9 R3.1
  Inner1 w10: v1(4031.4,3703) 4031.4,3617 4375.4,3273 v1(4375.4,3222)
LED3: R4.1 U1.41 | length 734.8
  Top Layer w10: U1.41 4050.7,3717.9 4054.4,3714.1 v1(4054.4,3686)
  Top Layer w19.7: v1(4453.4,3220) 4453.4,3191.1 R4.1
  Inner1 w10: v1(4054.4,3686) 4054.4,3633.1 4453.4,3234.1 v1(4453.4,3220)
POWER_EN: D2.2 R5.1 R24.2 U1.40 | length 1317.1
  Top Layer w10: R24.2 R24.2@3424.1,3680.1 ; R5.1@3422.8,3724.4 3424.1,3723.1 R24.2@3424.1,3680.1 ; R24.2@3424.1,3677.2 R24.2@3424.1,3680.1 ; v1(3447.4,3679) 3446.4,3680.1 R24.2@3424.1,3680.1 ; D2.2 3593.1,3296.7 v1(3593.4,3297) ; U1.40 4070.4,3718.1 4085.4,3703 v1(4085.4,3677)
  Inner1 w10: v1(3447.4,3679) 3504.4,3679 3560.4,3623 3560.4,3390 3593.4,3357 v1(3593.4,3297)
  Bottom Layer w10: v1(3447.4,3679) 3959.4,3679 3974.4,3664 4072.4,3664 v1(4085.4,3677)
REST: C3.2 R1.1 SW4.1 U1.7 | length 486.7
  Top Layer w10: v1(3786.4,3488) 3786.4,3531.7 R1.1 3790.2,3574.3 C3.2 3796.6,3580.8 U1.7 ; SW4.1 3837.4,3178.5 v1(3837.4,3206)
  Bottom Layer w10: v1(3786.4,3488) 3837.4,3437 v1(3837.4,3206)
SPI_CS: U1.14 U4.1 | length 314.6
  Top Layer w10: U4.1 3926.1,3206 3983.4,3206 4004.4,3227 4004.4,3284 3932.6,3355.9 U1.14
SPI_MISO: U1.16 U4.2 | length 421.5
  Top Layer w10: U4.2 v1(3982.4,3154.9) v1@3982.4,3155 ; U1.16 3972,3377.5 4047.4,3302 v1(4047.4,3156)
  Bottom Layer w10: v1(3982.4,3154.9) 4046.4,3154.9 v1(4047.4,3156)
SPI_MOSI: U1.17 U4.5 | length 513.6
  Top Layer w10: U1.17 3991.7,3384.8 4073.4,3303 v1(4073.4,3132) ; v1@4106.4,3055 v1(4106.5,3054.9) U4.5
  Bottom Layer w10: v1(4073.4,3132) 4073.4,3088 v1(4106.5,3054.9)
SPI_SCK: U1.15 U4.6 | length 513.2
  Top Layer w10: U1.15 3952.3,3366.2 4024.4,3294 4024.4,3134 4056.4,3102 4201.1,3102 U4.6
STDBY: U1.19 U2.5 | length 1086.8
  Top Layer w10: v1(3250.4,3225) 3249.5,3225.9 U2.5 U2.5@3250.4,3294.4 ; U1.19 4031,3463.5 v1(4036.4,3469)
  Inner1 w10: v1(3250.4,3225) 3304.4,3171 3397.4,3171 3427.4,3201 3607.4,3201 3756.4,3350 3977.4,3350 4036.4,3409 v1(4036.4,3469)
SWCLK: H1.2 U1.37 | length 954.4
  Top Layer w10: v1(4129.5,3711) U1.37
  Inner1 w10: v1(4129.5,3711) 4155.4,3711 4343.4,3523 4343.4,3387 4546.4,3184 4625.4,3184 4644.4,3165 4644.4,3079.9 H1.2
SWDIO: H1.1 U1.34 | length 939.2
  Top Layer w10: U1.34 v1(4240,3659.5) v1@4240.4,3659
  Inner1 w10: v1(4240,3659.5) 4364.4,3535 4364.4,3397 4554.4,3207 4721.4,3207 4743.2,3185.2 H1.1
TGT_NTRST: R15.2 U1.31 | length 208.7
  Top Layer w10: U1.31 4252.8,3600.4 4288.4,3636 4288.4,3668 4306.4,3686 4341.9,3686 R15.2
TGT_RSET: R27.1 U1.25 | length 274.9
  Top Layer w10: U1.25 4239.2,3482.3 v1(4243.4,3478) ; v1(4314.4,3634) 4340.4,3634 R27.1
  Bottom Layer w10: v1(4243.4,3478) 4249.4,3478 4274.4,3503 4274.4,3594 v1(4314.4,3634)
TGT_SWCLK: R11.2 U1.26 | length 179.5
  Top Layer w10: U1.26 4263.4,3502 4324.5,3440.9 R11.2
TGT_SWDIO: R17.2 U1.27 U1.28 | length 254.5
  Top Layer w10: U1.27 U1.27@4188.8,3522 ; U1.27@4188.5,3522 U1.27@4188.8,3522 ; U1.28 4253.1,3541.4 4259.3,3535.1 4259.3,3522 ; R17.2 4340.5,3492 4306.4,3492 4276.4,3522 4259.3,3522 ; U1.27@4188.8,3522 4259.3,3522
TGT_TDI: R16.2 U1.30 | length 157
  Top Layer w10: U1.30 4261.2,3580.8 4267.9,3587.5 R16.2
TGT_TDO: R28.1 U1.29 | length 163.6
  Top Layer w10: U1.29 4268.4,3561.1 4289.4,3540 4341.4,3540 R28.1
UART_RX: R18.1 U1.22 | length 473.5
  Top Layer w10: U1.22 4090.1,3469.6 v1(4096.4,3476) ; v1(4307.5,3734.1) R18.1
  Bottom Layer w10: v1(4096.4,3476) 4096.4,3505 4210.4,3619 4210.4,3701 4243.5,3734.1 v1(4307.5,3734.1)
UART_TX: R14.2 U1.21 | length 542.4
  Top Layer w10: v1(4063.4,3476) 4070.4,3469 U1.21 ; v1(4309.4,3783) 4342.6,3783 R14.2
  Bottom Layer w10: v1(4063.4,3476) 4063.4,3503 4191.4,3631 4191.4,3741 4233.4,3783 v1(4309.4,3783)
USB_DM: R7.2 U1.32 | length 803.2
  Top Layer w10: R7.2 3429.5,3556 v1(3458.4,3556) ; v1(4132.4,3615) 4149.9,3615 4155,3620.1 U1.32
  Bottom Layer w10: v1(3458.4,3556) 3471.3,3556 3477.3,3562 3884.1,3562 3943.1,3621 4113.6,3621 4119.6,3615 v1(4132.4,3615)
USB_DP: R8.1 U1.33 | length 801.8
  Top Layer w10: R8.1 3427.9,3584 v1(3458.4,3584) ; v1(4132.4,3643) 4150.7,3643 4153.9,3639.8 U1.33
  Bottom Layer w10: v1(3458.4,3584) 3471.3,3584 3477.3,3578 3877.4,3578 3936.4,3637 4113.6,3637 4119.6,3643 v1(4132.4,3643)
USB_EN: R25.2 R26.1 U1.39 | length 748.1
  Top Layer w10: R25.2 v1(3529.6,3733.6) R26.1 ; U1.39 4090.1,3790.6 v1(4111.4,3812)
  Bottom Layer w10: v1(3529.6,3733.6) 4033,3733.6 v1(4111.4,3812)
VCC_BT: D1.1 LDO1.1 Q1.2 SW2.2 | length 855.5
  Inner2 w10: v1(3556.4,3357) 3622.4,3357 3683.4,3418 3683.4,3732 3856.4,3905 3856.4,3992.9 SW2.2
  other v1: 3323.4,3223 3346.4,3223 3323.4,3244 3346.4,3244 3323.4,3267 3346.4,3267 3449.4,3334 3475.5,3334 3556.4,3333.6 3449.4,3357 3475.5,3357
pads on no net: LDO1.4 U1.2 U1.3 U1.4 U1.20 U1.38 USB1.A5 USB1.A8 USB1.B5 USB1.B8

## Polygon pours and split planes (outlines as drawn)
3.3V on Inner1 (solid, remove dead copper): 3005.4,4181.1 3005.4,3000 4974,3000 4974,4181.1
GND on Inner2 (solid, remove dead copper): 3005.4,4181.1 3005.4,3000 4974,3000 4974,4181.1
GND on Bottom Layer (solid, remove dead copper, pour order 6): 3012.4,3001 4981,3001 4981,4182.1 3012.4,4182.1
GND on Top Layer (solid, remove dead copper, pour order 6): 3012.5,4182.1 3012.5,3001 4981,3001 4981,4182.1

## Keep-outs
Board Outline Layer:
  lines w10: 3005.4,3039.4 3005.4,4141.7 3005.8,4146.9 3006.8,4151.9 3008.4,4156.8 3010.7,4161.4 3013.6,4165.7 3017,4169.6 3020.9,4173 3025.1,4175.8 3029.8,4178.1 3034.6,4179.8 3039.7,4180.8 3044.8,4181.1 4934.6,4181.1 4939.7,4180.8 4944.8,4179.8 4949.6,4178.1 4954.3,4175.8 4958.6,4173 4962.4,4169.6 4965.8,4165.7 4968.7,4161.4 4971,4156.8 4972.6,4151.9 4973.6,4146.9 4974,4141.7 4974,3039.4 4973.6,3034.2 4972.6,3029.2 4971,3024.3 4968.7,3019.7 4965.8,3015.4 4962.4,3011.5 4958.6,3008.1 4954.3,3005.3 4949.6,3003 4944.8,3001.3 4939.7,3000.3 4934.6,3000 3044.8,3000 3039.7,3000.3 3034.6,3001.3 3029.8,3003 3025.1,3005.3 3020.9,3008.1 3017,3011.5 3013.6,3015.4 3010.7,3019.7 3008.4,3024.3 3006.8,3029.2 3005.8,3034.2 3005.4,3039.4

## Other copper
Top Layer:
  region net 5V: 3269.5,3508 3269.5,3483 3411.4,3483 3411.4,3508
  region net 5V: 3357.3,3508.1 3357.3,3293 3428.5,3293 3428.5,3508.1
  region net 5V: 3271.5,3332 3271.5,3284 3414.5,3284 3414.5,3332
  region net 5V: 3407.5,3304 3407.5,3230.1 3536.9,3230.1 3536.9,3304
  region net BAT: 3274.9,3204.8 3274.9,3082.7 3477.9,3082.7 3477.9,3204.8
  region net BAT: 3238.4,3117 3238.4,3083 3357.5,3083 3357.5,3117
  region net BAT: 3376.9,3098.3 3376.9,3027.7 3477.9,3027.7 3477.9,3098.3
  region net VCC_BT: 3310.5,3277.5 3310.5,3212.6 3400.1,3212.6 3400.1,3277.5
  region net VCC_BT: 3439.5,3367 3439.5,3314.3 3642.3,3314.3 3642.3,3367
  region net 3.3V: 3573.5,3457 3573.5,3374 3683.5,3374 3683.5,3457
  region net 3.3V: 3573.5,3584.7 3573.5,3415.5 3656.1,3415.5 3656.1,3584.7
  region net 3.3V: 3812.5,3694 3829.6,3693.6 3829.6,3704.2 3813.4,3704
  region net 3.3V: 3894.9,3703.9 3878.1,3704.2 3878.1,3693.6 3894.9,3693.9
  region net $1N1116: 3812.8,3625 3813,3615 3829.6,3614.8 3829.6,3625.4
  region net REST: 3812.9,3575.8 3829.6,3575.5 3829.6,3586.1 3812.9,3585.8
  region net KEY_M: 3819.1,3526.7 3819.1,3516.7 3829.6,3516.4 3829.6,3527
  region net KEY_R: 3894.9,3477.3 3894.9,3487.3 3878.1,3487.6 3878.1,3477
  region net BAT_ADC: 3917.9,3382.2 3918.2,3399 3907.6,3399 3907.9,3382.2
  region net SPI_CS: 3937.6,3382.2 3937.9,3399 3927.3,3399 3927.6,3382.2
  region net SPI_SCK: 3957.3,3382.2 3957.6,3399 3947,3399 3947.3,3382.2
  region net SPI_MISO: 3977,3382.2 3977.3,3399 3966.7,3399 3967,3382.2
  region net SPI_MOSI: 3996.7,3384.8 3997,3399 3986.4,3399 3986.7,3384.8
  region net CHRG: 4006.4,3462.1 4006.1,3447.5 4016.7,3447.5 4016.4,3462.1
  region net STDBY: 4026,3463.5 4025.7,3447.5 4036.3,3447.5 4036,3463.5
  region net 3.3V: 4134.5,3382.2 4134.8,3399 4124.2,3399 4124.5,3382.2
  region net TGT_RSET: 4229.5,3487.3 4212.7,3487.6 4212.7,3477 4229.5,3477.3
  region net TGT_SWCLK: 4229.6,3497 4229.4,3507 4212.7,3507.3 4212.7,3496.7
  region net TGT_SWDIO: 4229.5,3536.4 4229.5,3546.4 4212.7,3546.7 4212.7,3536.1
  region net TGT_TDO: 4229.5,3566.1 4212.7,3566.4 4212.7,3555.8 4229.5,3556.1
  region net TGT_TDI: 4229.5,3575.8 4229.5,3585.8 4212.7,3586.1 4212.7,3575.5
  region net TGT_NTRST: 4229.5,3605.4 4212.7,3605.7 4212.7,3595.1 4229.5,3595.4
  region net USB_DM: 4155,3615.1 4164.2,3614.8 4164.2,3625.4 4155,3625.1
  region net USB_DP: 4153.9,3634.8 4164.2,3634.5 4164.2,3645.1 4153.9,3644.8
  region net SWDIO: 4229.5,3664.5 4212.7,3664.8 4212.7,3654.2 4229.5,3654.5
  region net SWCLK: 4134.5,3716.8 4134.8,3733.6 4124.2,3733.6 4124.5,3716.8
  region net USB_EN: 4085.1,3790.6 4084.8,3782.1 4095.4,3782.1 4095.1,3790.6
  region net POWER_EN: 4075.4,3718.1 4075.7,3733.6 4065.1,3733.6 4065.4,3718.1
  region net LED3: 4055.7,3717.9 4056,3733.6 4045.4,3733.6 4045.7,3717.9
  region net LED2: 4036,3716.8 4036.3,3733.6 4025.7,3733.6 4026,3716.8
  region net LED1: 4016.4,3718.1 4016.7,3733.6 4006.1,3733.6 4006.4,3718.1
  region net BOOT: 3996.4,3799.4 3986.4,3797.8 3986.4,3782.1 3997,3782.1
  region net IIC_SCL: 3967,3798.9 3966.7,3782.1 3977.3,3782.1 3977,3798.8
  region net IIC_SDA: 3957.4,3798.3 3947.4,3799.2 3947,3782.1 3957.6,3782.1
  region net 3.3V: 3907.9,3798.9 3907.6,3782.1 3918.2,3782.1 3917.9,3798.9
  region net $1N1116: 3697,3755.7 3708,3752.6 3736.3,3763.2 3707.6,3784
  region net $1N1115: 3683,3690.5 3676.1,3715.1 3647.4,3694.3 3675.7,3683.7
  region net $1N1115: 3680.9,3639.1 3688,3646.1 3683.8,3668 3652.7,3648.2
  region net $1N1116: 3692.9,3671.5 3701.9,3669.5 3733,3669.5 3700,3678.5
  region net REST: 3785.2,3549.2 3795.2,3549.2 3806.2,3564.2 3775.1,3564.2
  region net 3.3V: 3761.1,3511.3 3767.3,3524.8 3745,3524.8 3751.1,3511.3
  region net REST: 3785.2,3561.1 3779.1,3546.1 3801.3,3546.1 3795.2,3561.1
  region net REST: 3791.4,3509.8 3801.3,3524.8 3779.1,3524.8 3781.4,3509.8
  region net 3.3V: 3830.3,3694 3830.3,3704 3815.3,3714.6 3815.3,3683.5
  region net 3.3V: 3907.9,3788.3 3917.9,3788.3 3925.5,3803.3 3904.3,3803.3
  region net 3.3V: 3890.4,3815 3904.3,3803.3 3904.3,3834.5 3890.4,3825
  region net 3.3V: 4270.4,3707.9 4256.2,3718.5 4256.2,3687.4 4270.4,3697.9
  region net 3.3V: 4138.6,3340.5 4149.1,3355.5 4118,3355.5 4128.6,3340.5
  region net 3.3V: 4134.5,3391.8 4124.5,3391.8 4118,3376.8 4147,3376.8
  region net 3.3V: 3634.4,3528.8 3624.4,3528.8 3615.7,3513.8 3646.9,3513.8
  region net 3.3V: 3636.4,3463.3 3647.2,3478.3 3615.7,3478.3 3626.4,3463.3
  region net BOOT: 3996.4,3796.7 4004.3,3811.7 3983,3811.7 3986.4,3796.7
  region net 3.3V: 3636.4,3471.7 3626.4,3471.7 3617.7,3456.7 3641.3,3456.7
  region net $1N11995: 3709.3,3299.9 3716.1,3314.9 3692.5,3314.9 3699.3,3299.9
  region net $1N11995: 3731.1,3328.4 3731.1,3338.4 3716.1,3350.9 3716.1,3315.9
  region net D+: 3260.8,3605.4 3260.8,3595.4 3269.8,3595.3 3269.8,3605.5
  region net D+: 3263.4,3556.1 3269.8,3556 3269.8,3566.2 3263.4,3566.1
  region net 5V_S: 3325.5,3690.1 3315,3694.9 3315,3675.2 3325.5,3680.1
  region net 3.3V: 4334.6,3051.1 4312.5,3057.1 4312.5,3025.6 4334.6,3031.5
  region net $1N24488: 4306.6,3153.6 4286.9,3153.6 4281,3124.1 4312.5,3124.1
  region net 3.3V: 4334.6,3051.1 4334.6,3031.5 4359.8,3025.6 4359.8,3057.1
  region net 3.3V: 4416.5,3051.1 4391.3,3057.1 4391.3,3025.6 4416.5,3031.5
  region net $1N24516: 4385.4,3153.6 4365.7,3153.6 4359.8,3124.1 4391.3,3124.1
  region net 3.3V: 4416.5,3051.1 4416.5,3031.5 4438.5,3025.6 4438.5,3057.1
  region net $1N24544: 4464.1,3153.6 4444.4,3153.6 4438.5,3124.1 4470,3124.1
  region net CHRG: 3217.1,3219.8 3207.1,3219.8 3201.3,3204.8 3223,3204.8
  region net $1N8401: 3186.3,3300.3 3186.3,3290.3 3201.3,3277.8 3201.3,3312.8
  region net STDBY: 3244.5,3260.6 3254.5,3260.6 3260.4,3275.6 3238.7,3275.6
  region net $1N37909: 3534.8,4006.4 3571.6,4028 3571.6,4038 3534.8,4059.6
  region net $1N37992: 4017.1,4006.4 4053.9,4028 4053.9,4038 4017.1,4059.6
  region net $1N38075: 4478.1,4068.3 4436.8,4079.1 4429.8,4072 4440.5,4030.7
  region net $1N24488: 4306.6,3115.5 4307.4,3145.1 4286.2,3145.1 4286.9,3115.5
  region net LED1: 4306.6,3221.4 4286.9,3221.4 4286.2,3201.4 4307.4,3201.4
  region net $1N24516: 4385.4,3115.5 4386.2,3145.1 4364.9,3145.1 4365.7,3115.5
  region net LED2: 4385.4,3221.9 4365.7,3221.9 4364.9,3201.4 4386.2,3201.4
  region net $1N24544: 4464.1,3115.5 4464.9,3145.1 4443.6,3145.1 4444.4,3115.5
  region net $1N39164: 3446.6,3640.7 3431.6,3646.3 3431.6,3625.1 3446.6,3630.7
  region net D+: 3391.4,3610.1 3397.5,3625.1 3375.3,3625.1 3381.4,3610.1
  region net D+: 3391.4,3617 3381.4,3617 3375.3,3602 3397.5,3602
  region net $1N8401: 3164.9,3300.3 3149.9,3303.8 3149.9,3281.5 3164.9,3290.3
  region net 3.3V: 3634.4,3594 3624.4,3594 3615.7,3549.2 3646.9,3584.6
  region net 3.3V: 3634.4,3534.2 3646.9,3549.2 3615.7,3549.2 3624.4,3534.2
  region net BAT_ADC: 3881.4,3360.6 3881.4,3350.6 3896.4,3344.5 3896.4,3366.8
  region net BAT: 3866.9,3307.3 3874,3314.4 3870.4,3332.7 3870.4,3310.4
  region net BAT_ADC: 3885.4,3360.6 3870.4,3366.8 3870.4,3344.5 3885.4,3350.6
  region net UART_TX: 4316.6,3778 4331.6,3772.3 4331.6,3793.5 4316.6,3788
  region net $1N16874: 4403,3777.9 4403,3787.9 4388,3793.5 4388,3772.3
  region net TGT_NTRST: 4316.6,3691 4316.6,3681 4331.6,3674.6 4331.6,3695.8
  region net $1N18455: 4403,3680.2 4403,3690.2 4388,3695.8 4388,3674.6
  region net TGT_TDI: 4316.6,3582.5 4331.6,3576.9 4331.6,3598.1 4316.6,3592.5
  region net $1N18483: 4403,3585.6 4403,3595.6 4388,3598.1 4388,3576.9
  region net TGT_SWDIO: 4316.6,3497 4316.6,3487 4331.6,3479.2 4331.6,3500.4
  region net $1N18511: 4403,3484.8 4403,3494.8 4388,3500.4 4388,3479.2
  region net SPI_MOSI: 4146.7,3049.9 4172.6,3042.9 4172.6,3066.9 4146.7,3059.9
  region net SPI_SCK: 4145.8,3107 4148.6,3097 4172.6,3092.9 4172.6,3116.9
  region net 3.3V: 4137.8,3144.2 4172.6,3142.9 4172.6,3166.9 4135.4,3163.8
  region net 3.3V: 4216.5,3246.4 4196.8,3246.4 4172.2,3216.9 4241.1,3215.5
  region net 3.3V: 3992.8,3114.8 3956.4,3116.9 3956.4,3092.9 3992.8,3095.1
  region net SPI_MISO: 3982.3,3159.9 3956.4,3166.9 3956.4,3142.9 3982.3,3149.9
  region net SPI_CS: 3982.7,3201 3981.8,3211 3956.4,3216.9 3956.4,3192.9
  region net 3.3V: 4216.5,3227.6 4222.2,3257.1 4191.1,3257.1 4196.8,3227.6
  region net 3.3V: 4196.8,3297.2 4191.1,3278.3 4222.2,3278.3 4216.5,3297.2
  region net $1N40670: 4469.3,3424.9 4427,3440.6 4418.5,3434.8 4425.4,3395
  region net $1N18511: 4436.6,3516.6 4400.2,3494.8 4400.4,3484.8 4437.7,3463.5
  region net $1N41192: 4525.2,3592.8 4514.4,3551.5 4521.5,3544.4 4562.8,3555.2
  region net $1N18483: 4437.1,3617.1 4400.3,3595.6 4400.3,3585.6 4437.1,3564
  region net $1N41105: 4525.2,3692.8 4514.4,3651.5 4521.5,3644.4 4562.8,3655.2
  region net $1N18455: 4433.4,3713.3 4399.7,3690.2 4401.2,3680.2 4441.4,3660.7
  region net $1N41019: 4525.2,3792.8 4514.4,3751.5 4521.5,3744.4 4562.8,3755.2
  region net $1N16874: 4410.1,3777.9 4425.1,3765.4 4425.1,3800.4 4410.1,3787.9
  region net IIC_SDA: 4685,4051.9 4678.7,4075.9 4653.9,4051.2 4677.9,4044.9
  region net IIC_SCL: 4700,4093 4695.9,4054.2 4703,4047.2 4741.8,4051.3
  region net $1N37909: 3618.2,4038 3618.2,4028 3633.2,4025.6 3633.2,4047.9
  region net KEY_L: 3638.9,3976.5 3648.9,3976.5 3654.5,3991.5 3633.2,3991.5
  region net $1N37992: 4097.9,4038 4097.9,4028 4112.9,4025.6 4112.9,4047.9
  region net KEY_M: 4119.4,3976.5 4129.4,3976.5 4134.2,3991.5 4112.9,3991.5
  region net $1N38075: 4197.3,4058.5 4193.2,4047.9 4193.2,4025.6 4203.9,4050.9
  region net KEY_R: 4177.4,3976.5 4187.4,3976.5 4193.2,3991.5 4172,3991.5
  region net 5V_S: 3364.9,3729.4 3364.9,3719.4 3375.3,3713.8 3375.3,3735
  region net POWER_EN: 3429.1,3698.8 3431.6,3713.8 3409.4,3713.8 3419.1,3698.8
  region net POWER_EN: 3429.1,3705.7 3419.1,3705.7 3409.4,3690.7 3431.6,3690.7
  region net POWER_EN: 3446.4,3685.1 3431.6,3690.7 3431.6,3669.4 3446.4,3675.1
  region net $1N39413: 3569.5,3681.7 3559.5,3681.7 3555,3666.7 3578.7,3666.7
  region net 3.3V: 3488.6,3681.7 3480.2,3666.7 3503.9,3666.7 3498.6,3681.7
  region net 3.3V: 3508.8,3650.6 3503.9,3663.1 3503.9,3628.1 3508.8,3640.6
  region net $1N39164: 3529.4,3584.4 3519.4,3584.4 3517.6,3569.4 3541.3,3569.4
  region net USB_EN: 3519.3,3738.6 3504.3,3744.7 3504.3,3722.4 3519.3,3728.6
  region net 3.3V: 3488.6,3673.4 3498.6,3673.4 3504.3,3688.4 3483,3688.4
  region net $1N39413: 3569.5,3673.4 3575.1,3688.4 3553.9,3688.4 3559.5,3673.4
  region net USB_EN: 3538.9,3738.6 3538.9,3728.6 3553.9,3722.4 3553.9,3744.7
  region net REST: 3832.4,3206 3819.9,3192.9 3853.9,3192.9 3842.4,3206
  region net TGT_SWCLK: 4324.5,3435.9 4331.6,3430.3 4331.6,3451.6 4324.5,3445.9
  region net $1N40670: 4403,3434 4403,3444 4388,3451.6 4388,3430.3
  region net $1N41019: 4403,3734 4403,3744 4388,3744.7 4388,3723.4
  region net UART_RX: 4316.6,3729.1 4331.6,3723.4 4331.6,3744.7 4316.6,3739.1
  region net $1N41105: 4403,3635 4403,3645 4388,3647 4388,3625.7
  region net TGT_RSET: 4316.6,3629 4331.6,3625.7 4331.6,3647 4316.6,3639
  region net $1N41192: 4403,3536 4403,3546 4388,3549.3 4388,3528
  region net TGT_TDO: 4316.6,3545 4316.6,3535 4331.6,3528 4331.6,3549.3
  region net POWER_EN: 3598.1,3296.7 3588.1,3296.7 3575.6,3282.5 3610.6,3282.5
  region net $1N11995: 3720.2,3272.7 3705.2,3282.5 3705.2,3253 3720.2,3262.7
  region net $1N11995: 3707.8,3283 3700.7,3290 3675.5,3282.5 3705.2,3262.7
  region net KEY_M: 3822.2,3297.5 3809.7,3282.5 3844.7,3282.5 3832.2,3297.5
  region net $1N11995: 3700.2,3272.7 3700.2,3262.7 3715.2,3253 3715.2,3282.5
  region net $1N11995: 3739.7,3328.4 3754.7,3322.2 3754.7,3344.5 3739.7,3338.4
  region net SPI_MISO: 4054.8,3162.5 4052.4,3172.7 4042.4,3172.7 4040.1,3162.5
  region net SPI_MOSI: 4080.8,3138.5 4078.4,3148.7 4068.4,3148.7 4066.1,3138.5
  region net SPI_MOSI: 4113,3047.5 4123.3,3049.9 4123.3,3059.9 4113,3062.3
  region net SPI_MISO: 3975.9,3162.3 3965.6,3159.9 3965.6,3149.9 3975.9,3147.5
  region net LED1: 4016.8,3692.5 4014.4,3702.7 4004.4,3702.7 4002.1,3692.5
  region net LED2: 4038.5,3709.8 4036,3720 4026,3719.5 4023.8,3709.2
  region net LED3: 4061.8,3692.5 4059.4,3702.7 4049.4,3702.7 4047.1,3692.5
  region net KEY_R: 3896.9,3489.1 3886.4,3487.3 3885.1,3477.3 3895.1,3474.5
  region net KEY_M: 4131.8,3970.5 4129.4,3980.7 4119.4,3980.7 4117.1,3970.5
  region net KEY_R: 4189.8,3969.5 4187.4,3979.7 4177.4,3979.7 4175.1,3969.5
  region net KEY_L: 3651.4,3979.9 3648.9,3990 3638.9,3989.4 3636.7,3979.1
  region net TGT_RSET: 4321,3626.6 4331.2,3629 4331.2,3639 4321,3641.4
  region net TGT_RSET: 4240.8,3487.5 4229.3,3487.3 4224.5,3477.3 4234.4,3474.2
  region net REST: 3793.8,3494.5 3791.4,3504.7 3781.4,3504.7 3779.1,3494.5
  region net REST: 3830.1,3199.5 3832.4,3189.3 3842.4,3189.3 3844.8,3199.5
  region net SWDIO: 4233.5,3666.8 4223.3,3664.5 4223.3,3654.5 4233.5,3652.1
  region net SWCLK: 4136.9,3717.6 4134.5,3727.8 4124.5,3727.8 4122.1,3717.6
  region net POWER_EN: 3585.9,3290.7 3588.1,3280.4 3598.1,3280.1 3600.6,3290.3
  region net POWER_EN: 3441.8,3687 3431.3,3685.1 3430.2,3675.1 3440.2,3672.4
  region net POWER_EN: 4092.8,3683.5 4090.4,3693.7 4080.4,3693.7 4078.1,3683.5
  region net 3.3V: 4263.9,3710.3 4253.7,3707.9 4253.7,3697.9 4263.9,3695.6
  region net 3.3V: 4141,3341.7 4138.6,3351.9 4128.6,3351.9 4126.2,3341.7
  region net UART_RX: 4314,3726.7 4324.2,3729.1 4324.2,3739.1 4314,3741.4
  region net UART_TX: 4316,3775.6 4326.2,3778 4326.2,3788 4316,3790.4
  region net 3.3V: 3897,3812.6 3907.2,3815 3907.2,3825 3897,3827.4
  region net 3.3V: 3890.9,3706.9 3881.2,3703.9 3884.5,3693.9 3895.6,3692.9
  region net BAT: 3877.8,3296.5 3875.4,3306.7 3865.4,3306.7 3863.1,3296.5
  region net CHRG: 4002.8,3460.2 4007.9,3458.5 4014.9,3465.6 4013.3,3470.6
  region net STDBY: 4026.7,3467.7 4026,3455.9 4036,3449.2 4039,3459.5
  region net CHRG: 3204.5,3241 3207.1,3230.9 3217.1,3231.6 3219.3,3242
  region net STDBY: 3257.2,3232.2 3254.5,3242.2 3244.5,3241.3 3242.5,3230.8
  region net 3.3V: 3763.6,3517.7 3761.1,3527.9 3751.1,3527.6 3748.9,3517.3
  region net USB_EN: 3536.1,3726.2 3546.3,3728.6 3546.3,3738.6 3536.1,3741
  region net USB_EN: 3523.1,3741 3512.9,3738.6 3512.9,3728.6 3523.1,3726.2
  region net USB_EN: 4101.6,3812.6 4096.1,3803.7 4103.2,3796.6 4112.1,3802.2
Inner1:
  region net SWCLK: 4670.6,3101.3 4649.4,3138.8 4639.4,3139.2 4617.5,3103.1
  region net SWDIO: 4738.2,3129.2 4725.7,3114.2 4760.7,3114.2 4748.2,3129.2
  region net LED1: 4002.1,3679.5 4004.4,3669.3 4014.4,3669.3 4016.8,3679.5
  region net LED2: 4024.1,3696.5 4026.4,3686.3 4036.4,3686.3 4038.8,3696.5
  region net LED3: 4047.1,3679.5 4049.4,3669.3 4059.4,3669.3 4061.8,3679.5
  region net LED1: 4304.2,3227.9 4301.8,3238.2 4291.8,3238.2 4289.4,3227.9
  region net LED2: 4382.8,3228.5 4380.4,3238.7 4370.4,3238.7 4368.1,3228.5
  region net LED3: 4460.8,3226.5 4458.4,3234.1 4448.4,3234.1 4446.1,3226.5
  region net KEY_L: 3637.1,3966.5 3639.4,3956.3 3649.4,3956.3 3651.8,3966.5
  region net SWDIO: 4239.4,3649.6 4248.3,3644.1 4255.4,3651.2 4249.8,3660.1
  region net SWCLK: 4136,3703.7 4146.2,3706 4146.2,3716 4136,3718.4
  region net POWER_EN: 3600.8,3303.5 3598.4,3313.7 3588.4,3313.7 3586.1,3303.5
  region net POWER_EN: 3454,3671.6 3464.2,3674 3464.2,3684 3454,3686.4
  region net BAT: 3863.1,3283.5 3865.4,3273.3 3875.4,3273.3 3877.8,3283.5
  region net CHRG: 3996.1,3463.5 3998.4,3453.3 4008.4,3453.3 4010.8,3463.5
  region net STDBY: 4029.1,3462.5 4031.4,3452.3 4041.4,3452.3 4043.8,3462.5
  region net CHRG: 3218,3240.6 3228.2,3243 3228.2,3253 3218,3255.4
  region net STDBY: 3249.8,3215.2 3258.7,3209.6 3265.8,3216.7 3260.3,3225.6
Inner2:
  region net VCC_BT: 3814.2,3997.6 3852.9,3989.4 3860,3996.5 3851.8,4035.2
  region net VCC_BT: 3563,3349.6 3573.2,3352 3573.2,3362 3563,3364.4
Bottom Layer:
  region net VCC_BT: 3309.5,3366 3309.5,3212 3569.5,3212 3569.5,3366
  region net SPI_MISO: 4040.2,3162.6 4030.2,3159.9 4031.3,3149.9 4041.8,3147.9
  region net SPI_MOSI: 4066.1,3125.5 4068.4,3115.3 4078.4,3115.3 4080.8,3125.5
  region net SPI_MOSI: 4107.1,3064.7 4098.2,3070.3 4091.2,3063.2 4096.7,3054.3
  region net SPI_MISO: 3988.9,3147.5 3999.1,3149.9 3999.1,3159.9 3988.9,3162.3
  region net TGT_RSET: 4304.6,3634.6 4299.1,3625.7 4306.2,3618.6 4315.1,3624.2
  region net TGT_RSET: 4252,3473.2 4260,3481.5 4256.3,3491.9 4247.1,3487.1
  region net REST: 3785.8,3478.2 3794.7,3472.6 3801.8,3479.7 3796.3,3488.6
  region net REST: 3844.8,3212.5 3842.4,3222.7 3832.4,3222.7 3830.1,3212.5
  region net POWER_EN: 3454,3671.6 3464.2,3674 3464.2,3684 3454,3686.4
  region net POWER_EN: 4075.6,3677.6 4070.1,3668.7 4077.2,3661.6 4086.1,3667.2
  region net UART_RX: 4301,3741.4 4290.8,3739.1 4290.8,3729.1 4301,3726.7
  region net UART_TX: 4302.9,3790.4 4292.7,3788 4292.7,3778 4302.9,3775.6
  region net USB_EN: 3536.1,3726.2 3546.3,3728.6 3546.3,3738.6 3536.1,3741
  region net USB_EN: 4101.6,3812.6 4096.1,3803.7 4103.2,3796.6 4112.1,3802.2

## Silkscreen, mask and mechanical layers (free items; w line width, h text height)
Top Silkscreen Layer:
  text "+" at 3399.4,3181 h45 r180
  text "GND" at 4500.1,3133.9 h45
  text "CLK" at 4602.5,3133.9 h45
  text "DIO" at 4704.9,3133.9 h45
  text "-" at 3525.1,3114.2 h45 r180
Bottom Silkscreen Layer:
  lines w10: 4631.4,3433.1 4938.5,3433.1 ; 4631.4,3538.1 4938.5,3538.1 ; 4631.4,3643 4938.5,3643 ; 4631.4,3748 4938.5,3748 ; 4785,3342.5 4785,3846.5 ; 4631.4,3342.5 4631.4,3846.5 4938.5,3846.5 4938.5,3342.5 4631.4,3342.5
  text "RX" at 4916.7,3772 h45
  text "TX" at 4762.4,3769 h45
  text "TRST" at 4916.7,3670.1 h45
  text "REST" at 4762.4,3667.3 h45
  text "TDI" at 4916.7,3568.3 h45
  text "TDO" at 4762.4,3565.6 h45
  text "TMS" at 4916.7,3466.4 h45
  text "GND" at 4762.4,3463.9 h45
  text "TCK" at 4916.7,3364.5 h45
  text "GND" at 4762.4,3362.2 h45